# Altium PCB Orion-Bridge-R2.PcbDoc
Units mil, origin at the board's own origin, x right, y up, seen from the top; angles counter-clockwise.
Board outline 3149.61 x 2362.2 mil, 2 copper layers (Top Layer, Bottom Layer), stack 62.992 mil thick; 28 components, 21 nets, 92 pads, 0 vias.
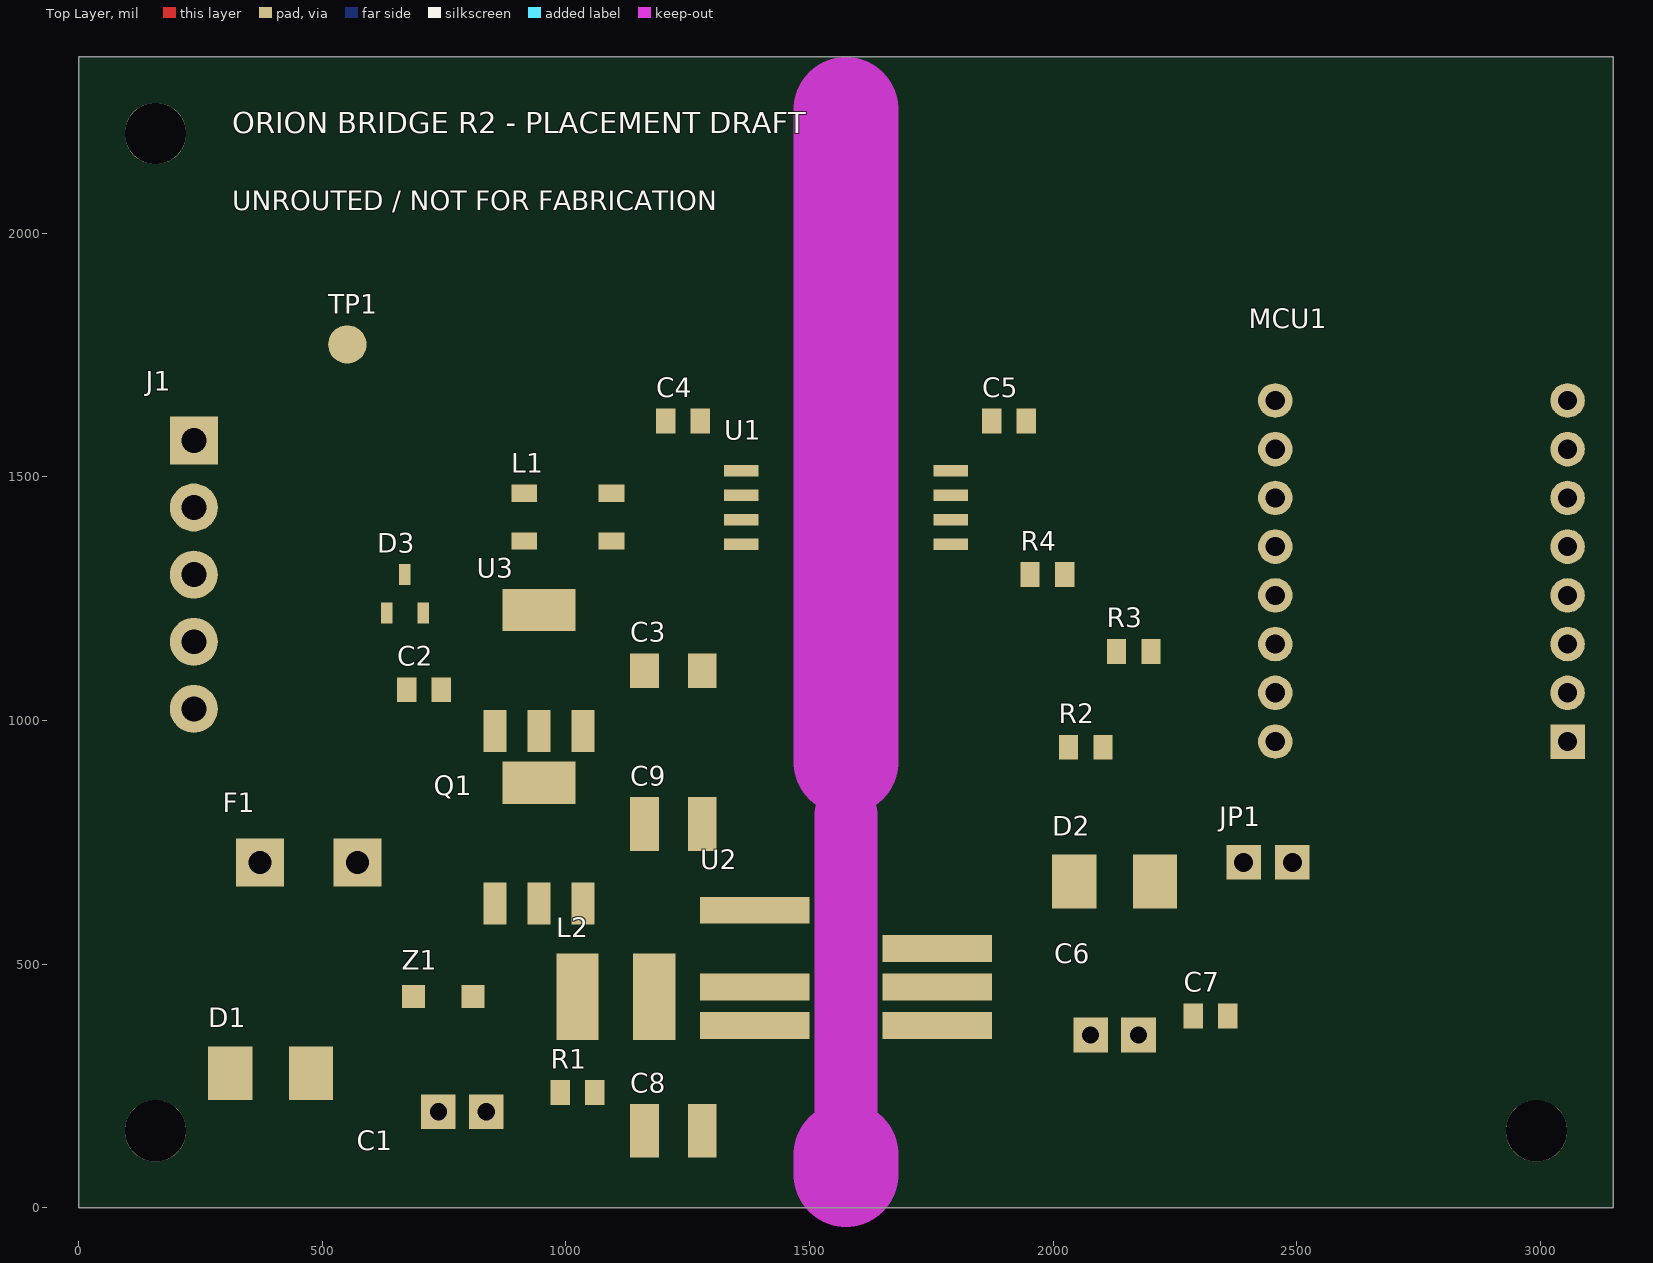
[diagram p0: Top Layer view]
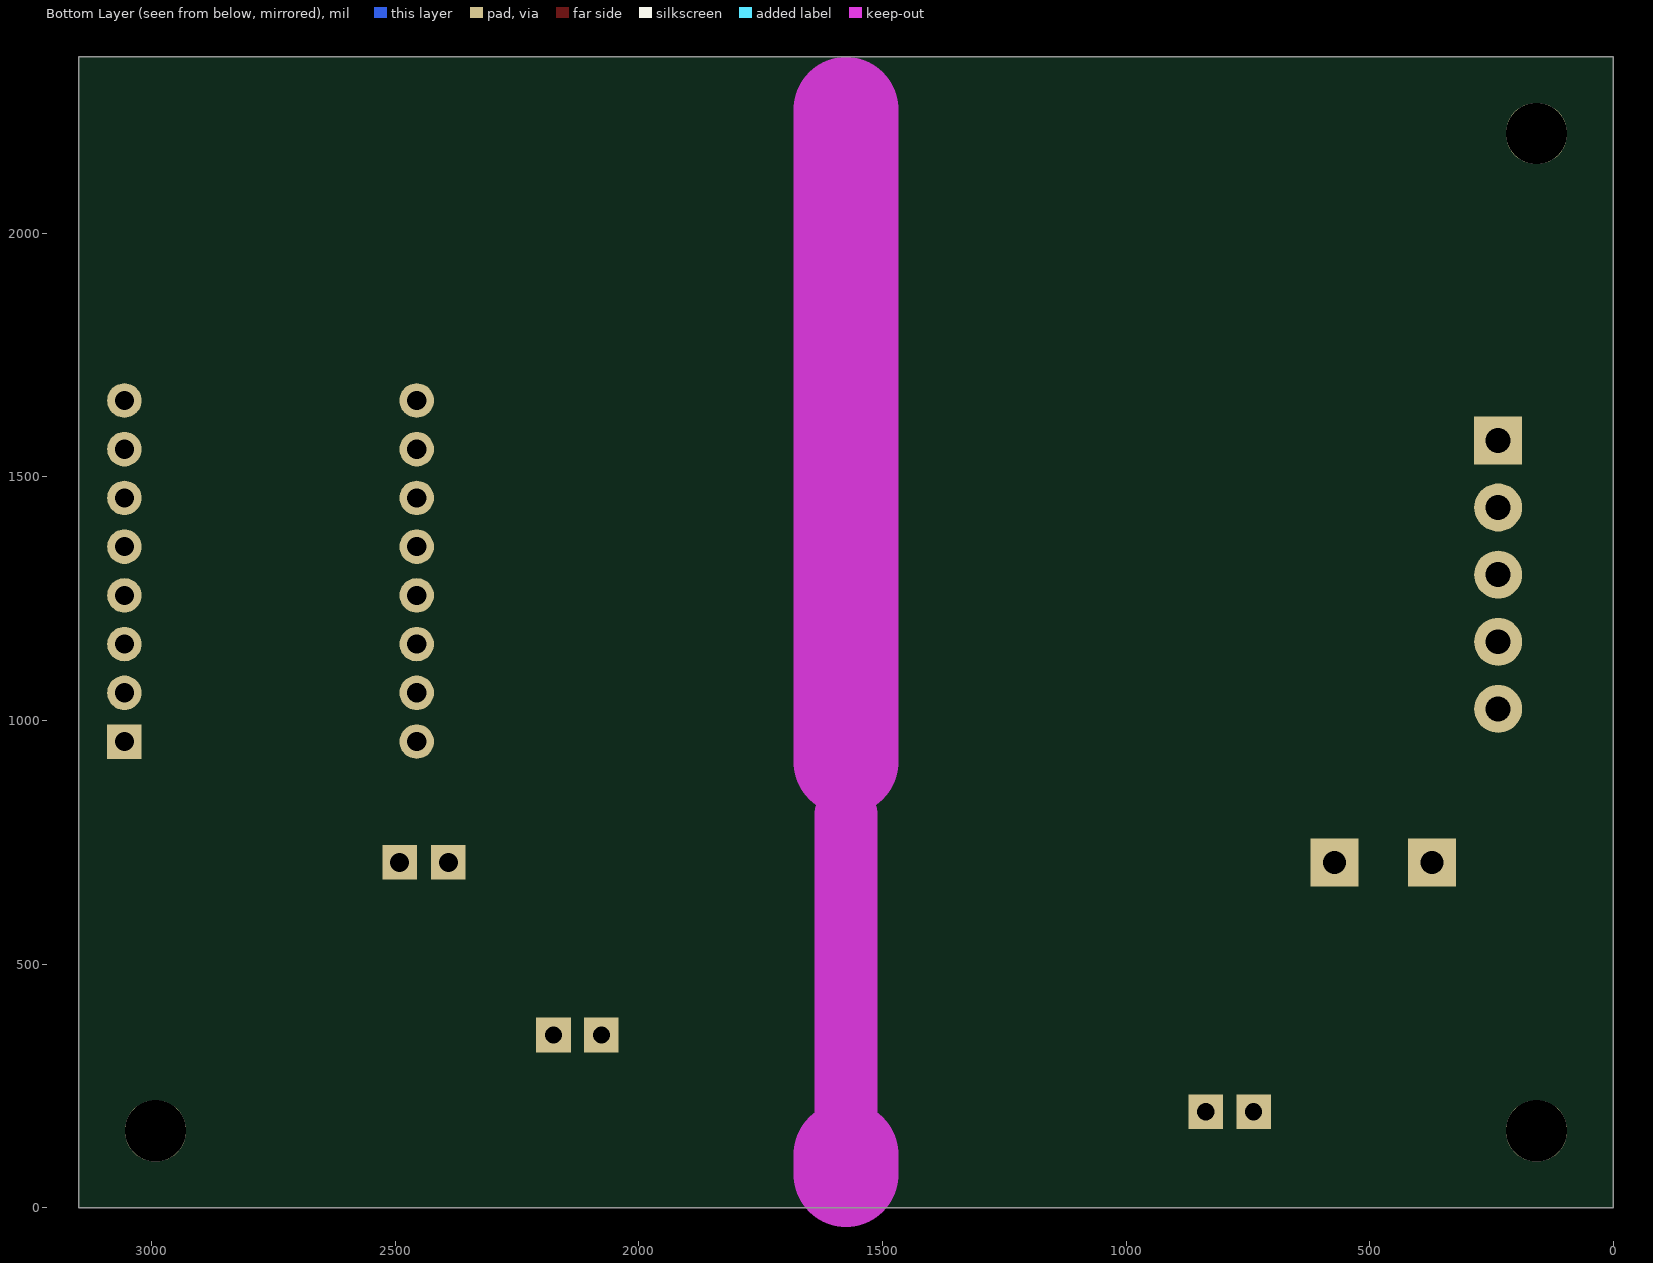
[diagram p1: Bottom Layer view, seen from below]

## Layer stack, top to bottom
Top Layer: signal copper 1.378
Dielectric: dielectric 60.2362, FR-4, Dk 4.3
Bottom Layer: signal copper 1.378

## Board outline
0,0 3149.61,0 3149.61,2362.2 0,2362.2

## Design rules (kind name [scope] priority, off if disabled: settings)
Clearance [All] p0: scope1count=1 scope1_0_kind=Board scope1_0_value=Board scope2count=1 scope2_0_kind=Board scope2_0_value=Board commentlength=0 gap=9.84
ShortCircuit [All] p0: scope1count=1 scope1_0_kind=Board scope1_0_value=Board scope2count=1 scope2_0_kind=Board scope2_0_value=Board commentlength=0 allowed=FALSE
SolderMaskExpansion [All] p0: scope1count=1 scope1_0_kind=Board scope1_0_value=Board scope2count=1 scope2_0_kind=Board scope2_0_value=Board commentlength=0 expansion=2.95
UnRoutedNet [All] p0: scope1count=1 scope1_0_kind=Board scope1_0_value=Board scope2count=1 scope2_0_kind=Board scope2_0_value=Board commentlength=0
Width [All] p0: scope1count=1 scope1_0_kind=Board scope1_0_value=Board scope2count=1 scope2_0_kind=Board scope2_0_value=Board commentlength=0 minlimit=9.84 maxlimit=78.74 preferedwidth=11.81

## Components (designator, comment, footprint, x,y, rotation, side; value= is the part's Value field where it differs from the comment)
C1 "47uF 50V" TBD_CAP_RADIAL_P2.5_D8 787.4,196.85 r0 top
C2 "1uF 50V X7R" C0805 708.66,1062.99 r0 top
C3 "10uF 16V X7R" C1206 1220.47,1102.36 r0 top
C4 "100nF 16V X7R" C0805 1240.16,1614.17 r0 top
C5 "100nF 16V X7R" C0805 1909.45,1614.17 r0 top
C6 "47uF 10V" TBD_CAP_RADIAL_P2.5_D6.3 2125.98,354.33 r0 top
C7 "100nF 16V X7R" C0805 2322.83,393.7 r0 top
C8 "10uF 50V X7R" C1210 1220.47,157.48 r0 top
C9 "10uF 50V X7R" C1210 1220.47,787.4 r0 top
D1 "SMBJ20A" SMB 393.7,275.59 r0 top
D2 "SS36" SMB 2125.98,669.29 r0 top
D3 "PESD2CAN24T-Q" SOT23 669.29,1259.84 r0 top
F1 "T0.8A >=60V" TBD_FUSE_9X6 472.44,708.66 r0 top
J1 "NMEA Micro-C pigtail" TBD_TERMINAL_5_3.5 236.22,1299.21 r0 top
JP1 "RUN closed / USB open" HDR1X2_2.54 2440.94,708.66 r0 top
L1 "ACT45B-510-2P-TL003" ACT45B 1003.94,1417.32 r0 top
L2 "15uH Isat>=1A" TBD_INDUCTOR_5X5 1102.36,433.07 r0 top
MCU1 "ESP32-C3 SuperMini" NOLOGO_C3_SUPERMINI_THT_2X8 2755.91,1338.58 r180 top
Q1 "DMP6023LE" SOT223_PMOS 944.88,748.03 r0 top
R1 "100k" R0805 1023.62,236.22 r0 top
R2 "10k" R0805 2066.93,944.88 r0 top
R3 "33R" R0805 2165.35,1141.73 r0 top
R4 "33R" R0805 1988.19,1299.21 r0 top
TP1 "Shield / chassis pad" TESTPOINT_2MM 551.18,1771.65 r0 top
U1 "ISO1042DWV" SOIC8_DWV 1574.8,1437.01 r180 top
U2 "R3M-2405S/SMD" R3M_SMD 1574.8,492.13 r0 top
U3 "TPS7B6950QDCYRQ1" SOT223_LDO 944.88,1102.36 r0 top
Z1 "BZT52C12" SOD123 748.03,433.07 r0 top

## Footprints (in the part's own frame and the unit in brackets; to place one, negate y for a bottom-side part, rotate by r counter-clockwise, add the part's x,y. Pads: shape width x height; smd on the part's side, far side on the other; paste and mask are expansions set on the pad)
ACT45B [mm] "TDK ACT45B recommended lands; windings 1-4 and 2-3"
  rect 1.35x0.9 smd: 1(-2.275,1.25) 2(-2.275,-1.25) 3(2.275,-1.25) 4(2.275,1.25)
C0805 [mm] "0805 generic capacitor lands; MPN review"
  rect 1x1.3 smd: 1(-0.9,0) 2(0.9,0)
C1206 [mm] "1206 generic capacitor lands; effective capacitance review"
  rect 1.5x1.8 smd: 1(-1.5,0) 2(1.5,0)
C1210 [mm] "1210 generic capacitor lands; effective capacitance review"
  rect 1.5x2.8 smd: 1(-1.5,0) 2(1.5,0)
HDR1X2_2.54 [mm] "TBD 2.54 mm service jumper; open BEFORE connecting USB"
  rect 1.8x1.8 hole 1: 1(-1.27,0) 2(1.27,0)
NOLOGO_C3_SUPERMINI_THT_2X8 [mm] "Nologo 16-pin interface; 15.24 mm rows / 2.54 mm pitch; carrier pads 1.8 mm / holes 1.0 mm; verify sockets"
  round 1.8 hole 1: 0(7.62,-8.079) 1(7.62,-5.539) 2(7.62,-2.999) 3(7.62,-0.459) 3V3(7.62,4.621) 4(7.62,2.081) 5V(7.62,9.701) 6(-7.62,7.161) 7(-7.62,4.621) 8(-7.62,2.081) 9(-7.62,-0.459) 10(-7.62,-2.999) 20(-7.62,-5.539) 21(-7.62,-8.079) GND(7.62,7.161)
  rect 1.8x1.8 hole 1: 5(-7.62,9.701)
R3M_SMD [mm] "RECOM recommended R3M SMD land pattern; 3.8 mm inner pad gap"
  rect 5.7x1.4 smd: 1(-4.75,-3) 2(-4.75,-1) 4(-4.75,3) 5(4.75,-3) 6(4.75,-1) 7(4.75,1)
R0805 [mm] "0805 generic resistor lands; MPN review"
  rect 1x1.3 smd: 1(-0.9,0) 2(0.9,0)
SMB [mm] "DO-214AA SMB generic lands; 1=cathode 2=anode; verify vendor"
  rect 2.3x2.8 smd: 1(-2.1,0) 2(2.1,0)
SOD123 [mm] "SOD-123 generic lands; 1=cathode 2=anode; verify vendor"
  rect 1.2x1.2 smd: 1(-1.55,0) 2(1.55,0)
SOIC8_DWV [mm] "TI DWV0008A manufacturer land pattern; pin 1 upper left"
  rect 1.8x0.6 smd: 1(-5.45,1.905) 2(-5.45,0.635) 3(-5.45,-0.635) 4(-5.45,-1.905) 5(5.45,-1.905) 6(5.45,-0.635) 7(5.45,0.635) 8(5.45,1.905)
SOT23 [mm] "SOT-23 generic lands; confirm Nexperia solder process"
  rect 0.6x1.1 smd: 1(-0.95,-1) 2(0.95,-1) 3(0,1)
SOT223_LDO [mm] "SOT-223 generic lands; confirm TI DCY / Diodes land pattern"
  rect 1.2x2.2 smd: 1(-2.3,-3.15) 2(0,-3.15) 3(2.3,-3.15)
  rect 3.8x2.2 smd: 4(0,3.15)
SOT223_PMOS [mm] "SOT-223 generic lands; confirm TI DCY / Diodes land pattern"
  rect 1.2x2.2 smd: 1(-2.3,-3.15) 2(0,-3.15) 3(2.3,-3.15)
  rect 3.8x2.2 smd: 4(0,3.15)
TBD_CAP_RADIAL_P2.5_D6.3 [mm] "TBD radial electrolytic 6.3 mm body, 2.5 mm pitch; 1=positive"
  rect 1.8x1.8 hole 0.9: 1(-1.25,0) 2(1.25,0)
TBD_CAP_RADIAL_P2.5_D8 [mm] "TBD radial electrolytic 8 mm body, 2.5 mm pitch; 1=positive"
  rect 1.8x1.8 hole 0.9: 1(-1.25,0) 2(1.25,0)
TBD_FUSE_9X6 [mm] "TBD fuse T0.8A >=60V; placeholder pads, not a selected fuse"
  rect 2.5x2.5 hole 1.2: 1(-2.54,0) 2(2.54,0)
TBD_INDUCTOR_5X5 [mm] "TBD 15uH >=1A inductor; replace footprint after MPN selection"
  rect 2.2x4.5 smd: 1(-2,0) 2(2,0)
TBD_TERMINAL_5_3.5 [mm] "TBD 5-wire pigtail pads; final connector, holes and strain relief required"
  rect 2.5x2.5 hole 1.3: 1(0,7)
  round 2.5 hole 1.3: 2(0,3.5) 3(0,0) 4(0,-3.5) 5(0,-7)
TESTPOINT_2MM [mm] "2 mm exposed top-copper test pad; no paste"
  round 2 smd: 1(0,0)

## Part data
C1: library part C_RADIAL_47UF_50V_D8_P2_5, "47uF 50V - generic specification; manufacturer/MPN not selected"
C2: library part C_0805_1UF_50V_X7R, "1uF 50V X7R - generic specification; manufacturer/MPN not selected"
C3: library part C_1206_10UF_16V_X7R, "10uF 16V X7R - generic specification; manufacturer/MPN not selected"
C4 C5 C7: library part C_0805_100NF_16V_X7R, "100nF 16V X7R - generic specification; manufacturer/MPN not selected"
C6: library part C_RADIAL_47UF_10V_D6_3_P2_5, "47uF 10V - generic specification; manufacturer/MPN not selected"
C8 C9: library part C_1210_10UF_50V_X7R, "10uF 50V X7R - generic specification; manufacturer/MPN not selected"
D1: library part SMBJ20A_SMB_GENERIC, "SMBJ20A - generic specification; manufacturer/MPN not selected"
D2: library part SS36_SMB_GENERIC, "SS36 - generic specification; manufacturer/MPN not selected"
D3: library part PESD2CAN24T-QR
F1: library part FUSE_T0_8A_60V_TBD, "T0.8A >=60V - generic specification; manufacturer/MPN not selected"
J1: library part NMEA_PIGTAIL_5_P3_5, "NMEA Micro-C pigtail - generic specification; manufacturer/MPN not selected"
JP1: library part JUMPER_1X2_P2_54, "RUN closed / USB open - generic specification; manufacturer/MPN not selected"
L1: library part ACT45B5102PTL003
L2: library part L_15UH_1A_5X5_TBD, "15uH Isat>=1A - generic specification; manufacturer/MPN not selected"
MCU1: library part ESP32_C3_SUPERMINI_NOLOGO, "Nologo ESP32-C3 SuperMini module, two 1x8 carrier headers, GPIO6 TX / GPIO7 RX"
R1: library part R_0805_100K, "100k - generic specification; manufacturer/MPN not selected"
R2: library part R_0805_10K, "10k - generic specification; manufacturer/MPN not selected"
R3 R4: library part R_0805_33R, "33R - generic specification; manufacturer/MPN not selected"
TP1: library part TESTPOINT_2MM, "Shield / chassis pad - generic specification; manufacturer/MPN not selected"
U2: library part R3M-2405S_SMD
Z1: library part BZT52C12_SOD123_GENERIC, "BZT52C12 - generic specification; manufacturer/MPN not selected"

## Free pads (board coordinates)
  round 125.98 hole 125.98 unplated mask+3.94: ""(157.48,157.48) ""(157.48,2204.72) ""(2992.13,157.48)

## Nets (pads, with @x,y where several pads share a name; then routed paths per layer and width w, separated by ;. In a path a pad name is that pad's centre, name@x,y a point inside that pad or via, vN(x,y) a via of type N, cw(c..) or ccw(c..) an arc to the next point about the centre after c; other vN are vias at no path point)
3V3_LOGIC: C5.1 MCU1.3V3 R2.1 U1.1
5V_AFTER_DIODE: D2.1 JP1.1
5V_BUS: C3.1 C4.1 U1.8 U3.3
5V_ISO: C6.1 C7.1 D2.2 U2.7
5V_MODULE: JP1.2 MCU1.5V
BUS_PROT: C1.1 C2.1 C8.1 D1.1 L2.1 Q1.3 U3.1 Z1.1
CANH: L1.4 U1.7
CANH_EXT: D3.1 J1.4 L1.1
CANL: L1.3 U1.6
CANL_EXT: D3.2 J1.5 L1.2
DCDC_IN: C9.1 L2.2 U2.1
FUSED_IN: F1.2 Q1.2 Q1.4
GATE: Q1.1 R1.1 Z1.2
GND_BUS: C1.2 C2.2 C3.2 C4.2 C8.2 C9.2 D1.2 D3.3 J1.3 R1.2 U1.5 U2.2 U3.2 U3.4
GND_LOGIC: C5.2 C6.2 C7.2 MCU1.GND U1.4 U2.6
GPIO6: MCU1.6 R3.1
GPIO7: MCU1.7 R4.2
NET_S: F1.1 J1.2
RXD: R4.1 U1.3
SHIELD: J1.1 TP1.1
TXD: R2.2 R3.2 U1.2
pads on no net: MCU1.0 MCU1.1 MCU1.2 MCU1.3 MCU1.4 MCU1.5 MCU1.8 MCU1.9 MCU1.10 MCU1.20 MCU1.21 U2.4 U2.5

## Keep-outs
Keep-Out Layer:
  lines w129.92: 1574.8,177.17 1574.8,807.09
  lines w216.54: 1574.8,68.9 1574.8,108.27 ; 1574.8,915.35 1574.8,2253.94

## Silkscreen, mask and mechanical layers (free items; w line width, h text height)
Top Overlay:
  text "ORION BRIDGE R2 - PLACEMENT DRAFT" at 314.96,2204.72 h43.31
  text "UNROUTED / NOT FOR FABRICATION" at 314.96,2047.24 h39.37
Board outline:
  the board outline again, w5.91
Isolation and RF planning:
  lines w3.94: 1456.69,0 1456.69,2362.2 ; 1692.91,0 1692.91,2362.2
  lines w5.91: 2204.72,1692.91 3149.61,1692.91 3149.61,2362.2 2204.72,2362.2 2204.72,1692.91
  text "RF KEEP CLEAR - VERIFY" at 2244.09,2244.09 h31.5
Design notes:
  text "MECH1: outline; MECH2: planning; MECH13: body; MECH15: courtyard" at 196.85,-196.85 h39.37
  text "Nologo 16-pin carrier. Verify module, generic parts and supply before routing." at 196.85,-314.96 h39.37
  text "No PCB 120R termination. JP1 open BEFORE USB. GND_BUS and GND_LOGIC stay isolated." at 196.85,-433.07 h39.37